# Altium PCB PCB-Thermostat.PcbDoc (part 3 of 5)
Units mm, origin at the board's own origin, x right, y up, seen from the top; angles counter-clockwise.
Board outline 100 x 90 mm, 4 copper layers (Top, PWR, GND, Bottom), stack 1.585 mm thick; 188 components, 167 nets, 703 pads, 398 vias.
Unrouted connection lines stored in the file: 2.
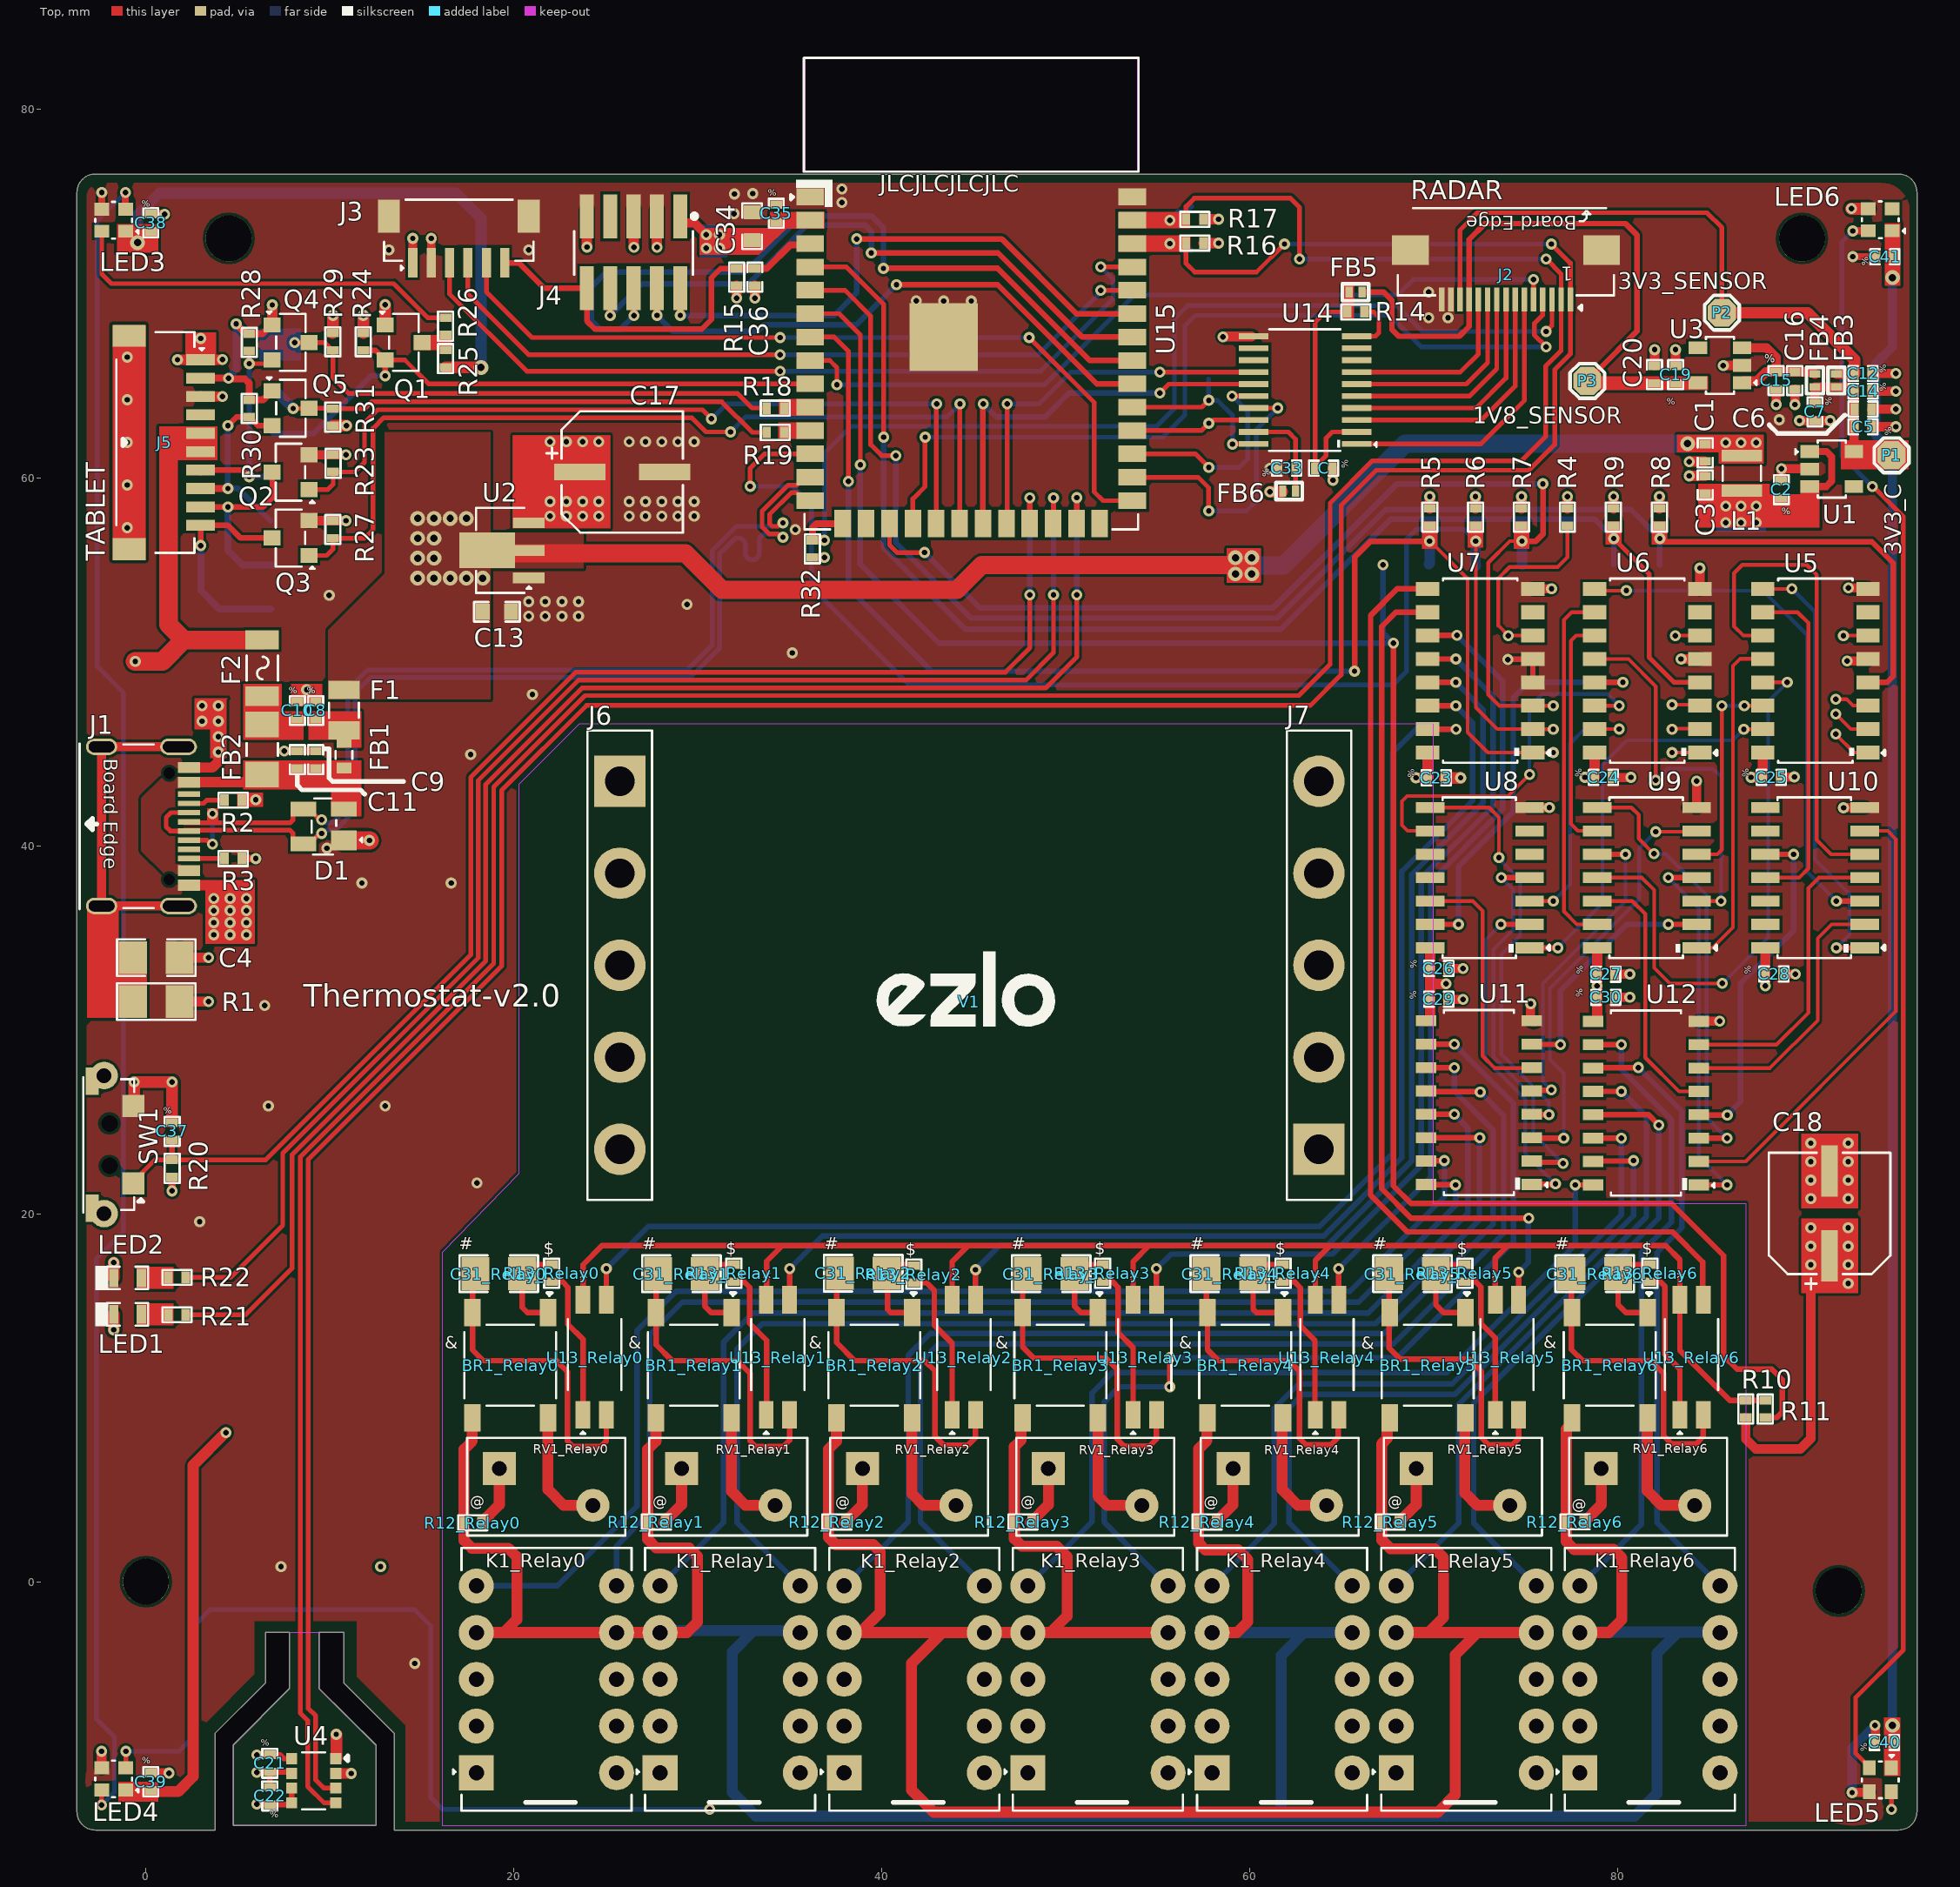
[diagram p0: Top view]

## Via types
v1: diameter 0.6, hole 0.3, Top to Bottom, 374 vias
v2: diameter 0.8, hole 0.4, Top to Bottom, 22 vias
v3: diameter 0.6, hole 0.3, Top to Bottom, tented top, 2 vias

## Nets (pads, with @x,y where several pads share a name; then routed paths per layer and width w, separated by ;. In a path a pad name is that pad's centre, name@x,y a point inside that pad or via, vN(x,y) a via of type N, cw(c..) or ccw(c..) an arc to the next point about the centre after c; other vN are vias at no path point)
1V8_SENSOR: C19.1 C20.2 FB5.1 J2.12 P3.1 U3.5 | length 31.9
  Top w0.254: P3.1@78.332,65.113 P3.1@78.332,65.259
  Top w0.305: FB5.1@66.085,70.079 67.266,70.079 67.714,69.631 67.714,68.045 68.075,67.684 71.379,67.684 71.914,68.218 J2.12@71.914,69.679 71.914,72.949 72.77,73.805 80.41,73.805 81.026,73.189 81.026,67.953 78.858,65.785 78.858,65.354 78.763,65.259 P3.1@78.332,65.259
3V3_C: C5.1 C6.2 C7.1 C14.1 FB3.1 FB4.1 P1.1 U1.5 | length 6.4
  Top w0.508: C7.1@90.703,64.046 FB4.1@90.703,64.92 ; FB4.1@90.703,64.928 FB4.1@90.703,64.92 ; U1.5@92.821,61.415 92.835,61.43 92.835,64.68 C14.1@92.85,64.694 92.85,64.732 92.824,64.757 92.723,64.757 92.552,64.928 FB3.1@91.872,64.928 90.711,64.928 FB4.1@90.703,64.92